# Altium PCB Octo-Electrode.PcbDoc (part 4 of 6)
Units mm, origin at the board's own origin, x right, y up, seen from the top; angles counter-clockwise.
Board outline 202.91 x 135.89 mm, 2 copper layers (Top Layer, Bottom Layer); 289 components, 165 nets, 790 pads, 510 vias.
Unrouted connection lines stored in the file: 83.
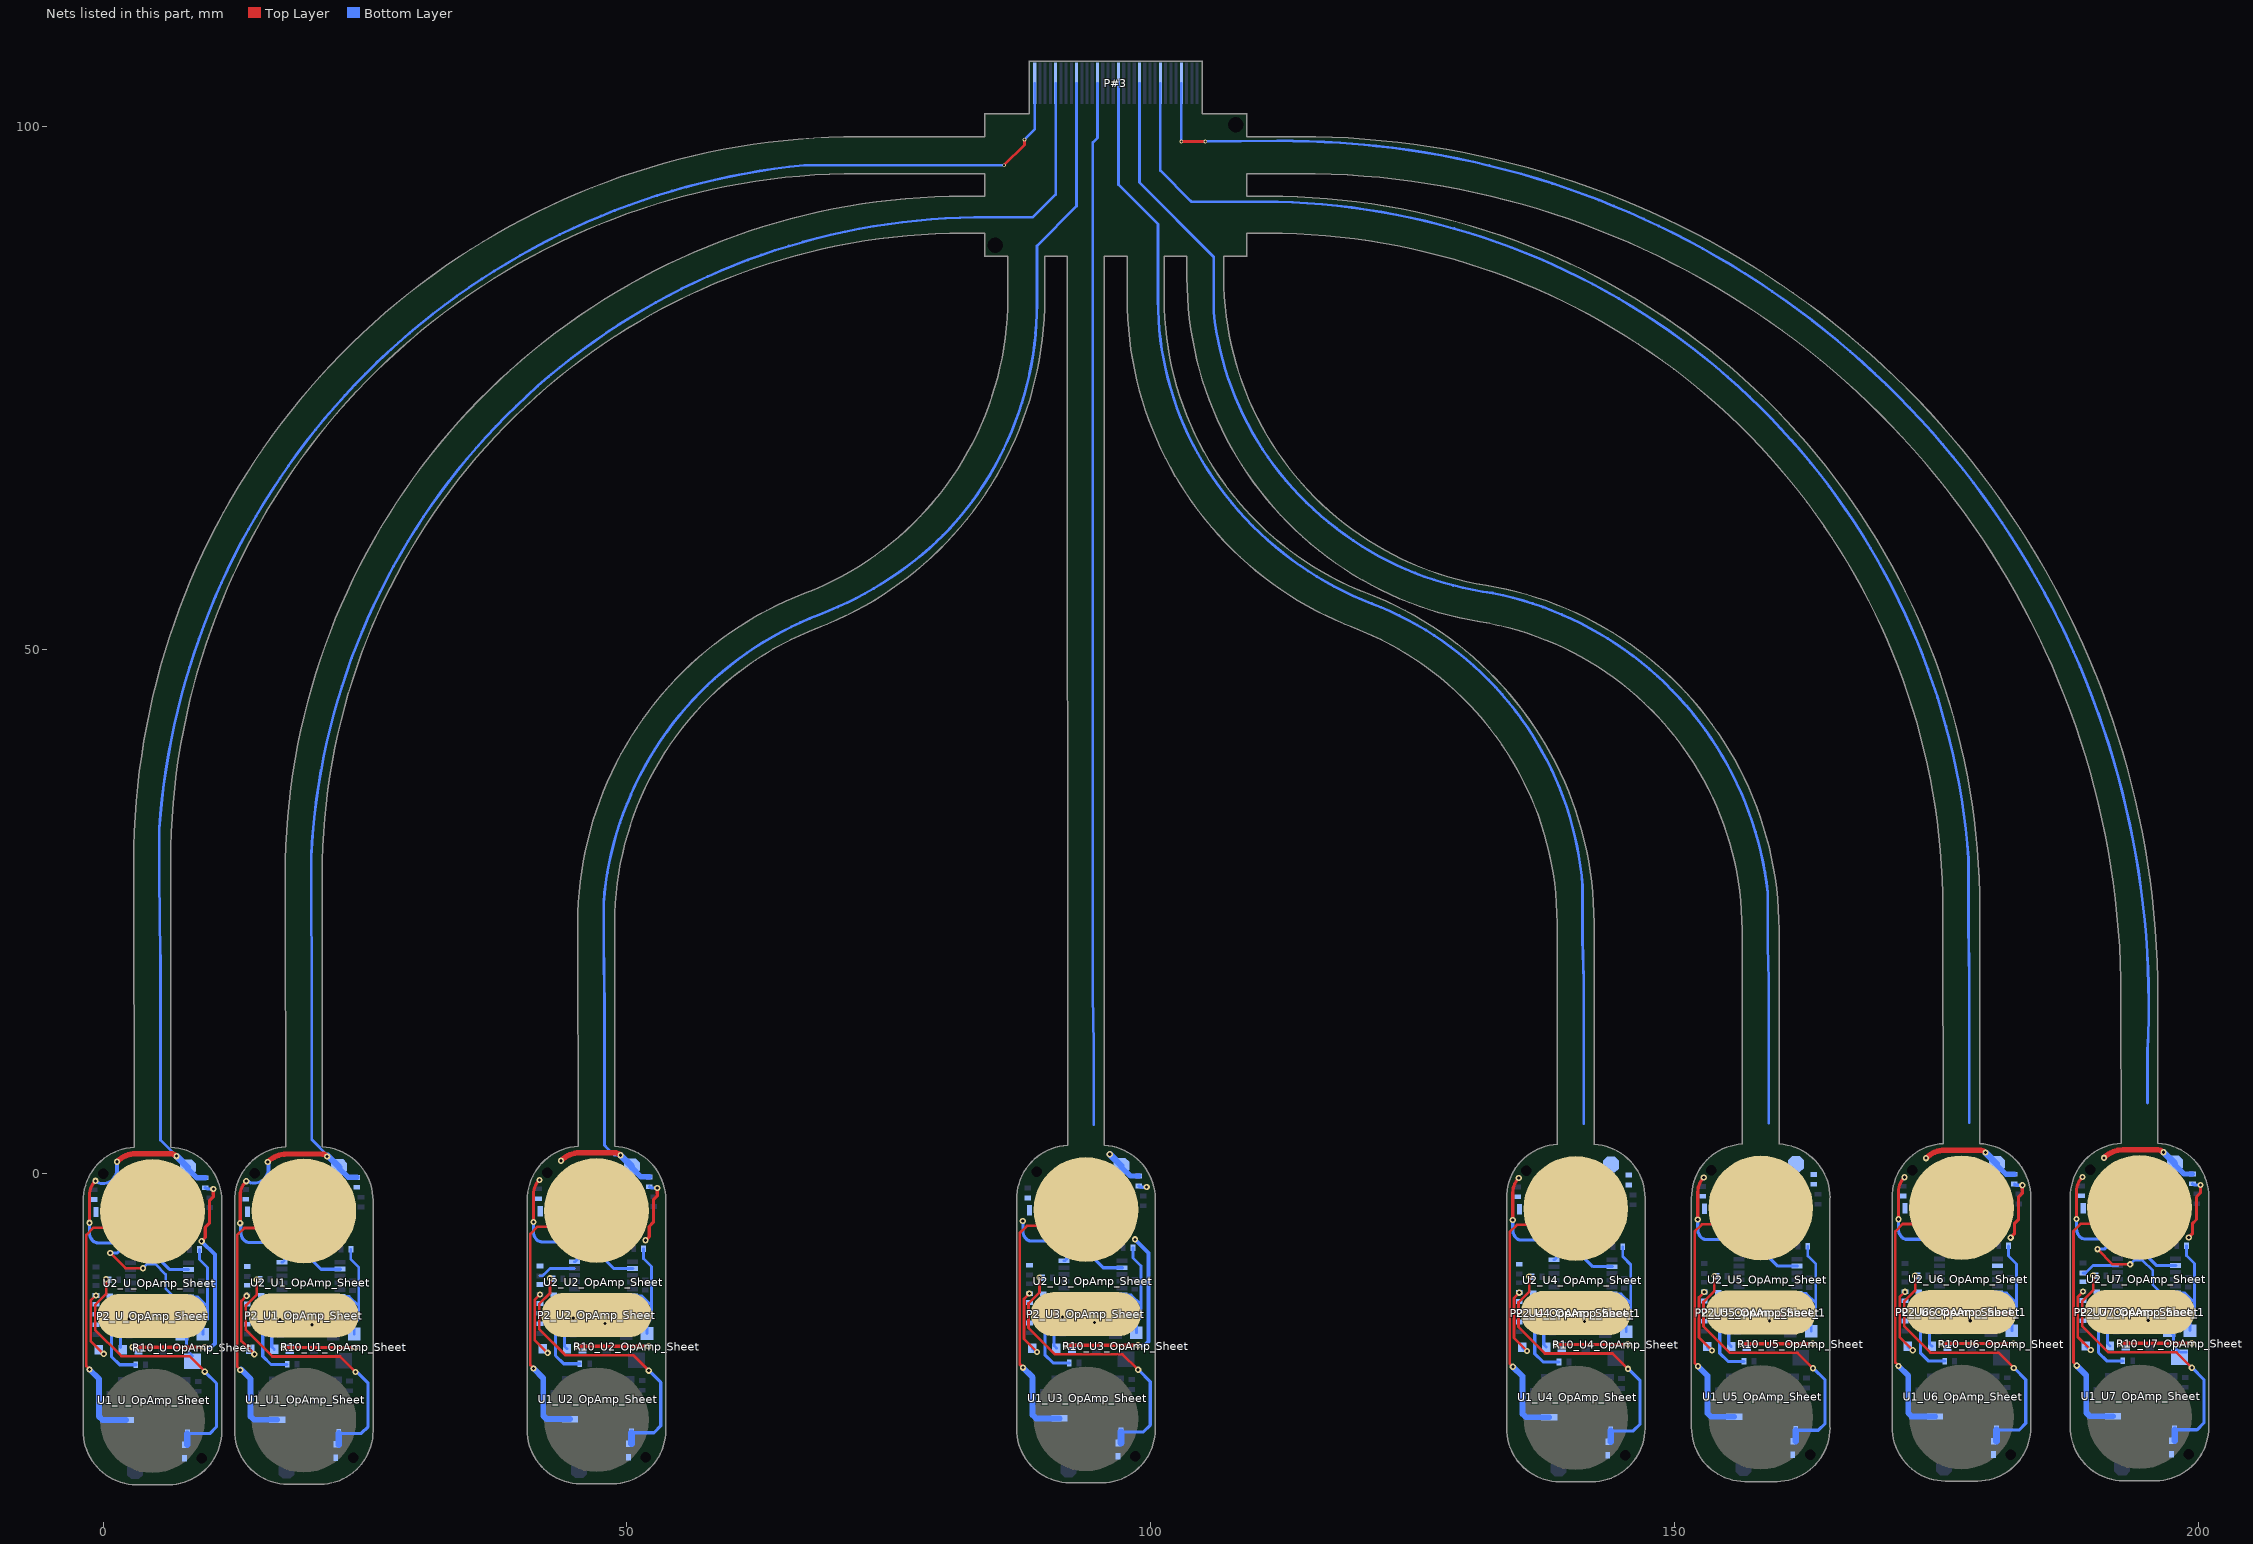
[diagram p3: the nets of this part, all layers, seen from the top]

## Via types
v1: diameter 0.6, hole 0.3, Top Layer to Bottom Layer, tented both sides, 464 vias
v2: diameter 0.35, hole 0.2, Top Layer to Bottom Layer, 46 vias

## Nets (pads, with @x,y where several pads share a name; then routed paths per layer and width w, separated by ;. In a path a pad name is that pad's centre, name@x,y a point inside that pad or via, vN(x,y) a via of type N, cw(c..) or ccw(c..) an arc to the next point about the centre after c; other vN are vias at no path point) (continued)
Measure*_U7_OpAmp_Sheet: R10_U7_OpAmp_Sheet.1 R10_U7_OpAmp_Sheet.2 SB8_U7_OpAmp_Sheet.1 SB8_U7_OpAmp_Sheet_1.1 U2_U7_OpAmp_Sheet.14 | length 17.4
  Top Layer w0.254: v1(190.368,-7.204) 191.817,-8.653 v1(193.495,-8.653)
  Bottom Layer w0.254: v1(193.495,-8.653) 193.881,-8.267 194.669,-8.267 195.654,-9.252 195.654,-10.604 197,-11.95 ; R10_U7_OpAmp_Sheet.1@197.21,-14.973 197.635,-15.398 197.635,-16.243 ; 197.21,-13.15 197.787,-12.573 ; 197.864,-16.675 198.219,-17.03 198.422,-17.03 R10_U7_OpAmp_Sheet.2@198.838,-17.03
  Bottom Layer w0.305: v1(190.368,-7.204) 191.028,-7.204 191.781,-6.451 SB8_U7_OpAmp_Sheet_1.1@191.781,-5.651
  Bottom Layer w0.559: R10_U7_OpAmp_Sheet.1@197.21,-14.973 197.21,-13.15
  other v1: 193.495,-8.653 190.368,-7.204
Measure*_U_OpAmp_Sheet: R10_U_OpAmp_Sheet.1 R10_U_OpAmp_Sheet.2 SB8_U_OpAmp_Sheet.1 U2_U_OpAmp_Sheet.14 | length 15.2
  Top Layer w0.254: v1(0.683,-7.572) 2.132,-9.022 v1(3.81,-9.022)
  Bottom Layer w0.254: v1(3.81,-9.022) 4.196,-8.636 4.984,-8.636 5.969,-9.621 5.969,-10.973 7.315,-12.319 ; 7.95,-16.612 R10_U_OpAmp_Sheet.1@7.95,-15.766 ; 8.179,-17.043 R10_U_OpAmp_Sheet.2@8.534,-17.399
  Bottom Layer w0.305: v1(0.683,-7.572) 1.343,-7.572 2.095,-6.82 SB8_U_OpAmp_Sheet.1@2.095,-6.205
  Bottom Layer w0.559: R10_U_OpAmp_Sheet.1@7.525,-15.342 7.525,-13.518
  other v1: 3.81,-9.022 0.683,-7.572
Measure_U1_OpAmp_Sheet: LED1_U1_OpAmp_Sheet.1 P3_U1_OpAmp_Sheet.1 P#3.5 SB7_U1_OpAmp_Sheet.2 SB8_U1_OpAmp_Sheet.2 | length 170.2
  Top Layer w0.305: v1(13.078,-4.721) 13.078,-2.098 cw(c15.041,-2.098) v1(13.653,-0.711)
  Top Layer w0.508: v1(15.71,1.118) 15.729,1.136 cw(c17.525,-0.66) 17.525,1.88 20.819,1.88 cw(c20.819,1.083) v1(21.383,1.647)
  Bottom Layer w0.254: 14.329,-0.901 14.4,-0.901 ; 18.401,-4.244 18.401,-3.646 ; v1@21.446,1.71 19.915,3.24 19.915,18.365 19.848,26.976 19.848,30.252 cw(c20.102,30.251) 19.848,30.263 cw(c84.036,27.021) 84.562,91.289 88.733,91.289 90.921,93.477 P#3.5@90.921,104.09
  Bottom Layer w0.305: v1@13.141,-4.658 13.141,-5.588 ccw(c14.236,-5.588) 13.462,-6.362 ccw(c13.952,-5.872) 13.952,-6.566 15.519,-6.566 ; v1@13.716,-0.647 ccw(c14.329,-0.034) 14.329,-0.901 ; 14.4,-0.901 ccw(c14.4,0.573) 15.443,-0.47 ; 15.798,-5.143 17.266,-5.143 ccw(c17.266,-3.842) 18.186,-4.762 ccw(c17.668,-4.244) 18.401,-4.244
  Bottom Layer w0.381: 15.443,-0.47 ccw(c14.646,0.328) 15.773,0.328 v1@15.773,1.181
  Bottom Layer w0.508: P3_U1_OpAmp_Sheet.1@22.529,0.521 23.406,-0.355 SB7_U1_OpAmp_Sheet.2@24.206,-0.355
  Bottom Layer w0.635: v1@21.446,1.71 P3_U1_OpAmp_Sheet.1@22.529,0.626
  other v1: 13.078,-4.721 13.653,-0.711 15.71,1.118 21.383,1.647
Measure_U2_OpAmp_Sheet: LED1_U2_OpAmp_Sheet.1 P3_U2_OpAmp_Sheet.1 P#3.9 SB7_U2_OpAmp_Sheet.2 SB8_U2_OpAmp_Sheet.2 | length 152.2
  Top Layer w0.305: v1(41.07,-4.605) 41.07,-1.982 cw(c43.033,-1.982) v1(41.645,-0.594) ; v1(51.779,-6.36) 52.135,-6.004 52.135,-5.039 52.521,-4.653 52.521,-2.494 52.897,-2.118 v1(52.897,-1.361)
  Top Layer w0.508: v1@43.72,1.253 cw(c45.516,-0.543) 45.516,1.997 48.811,1.997 cw(c48.811,1.2) v1(49.375,1.763)
  Bottom Layer w0.254: 43.355,-4.711 cw(c42.895,-5.171) 43.545,-5.171 ; SB8_U2_OpAmp_Sheet.2@43.545,-5.931 43.545,-5.171 ; 43.736,-5.092 ccw(c43.736,-5.362) 43.545,-5.171 ; 46.338,-4.193 46.338,-3.596 ; v1(49.375,1.763) 48.801,1.763 47.949,2.615 47.852,2.712 47.852,15.597 47.772,22.353 47.772,25.82 cw(c79.885,23.284) 68.361,53.365 ccw(c55.805,86.121) 77.522,58.571 ccw(c59.358,81.614) 83.534,64.989 ccw(c57.313,83.022) 89.137,83.022 89.137,88.574 92.921,92.358 P#3.9@92.921,104.09
  Bottom Layer w0.305: v1@41.078,-4.607 41.078,-5.537 ccw(c42.174,-5.537) 41.399,-6.312 ccw(c41.889,-5.821) 41.889,-6.515 43.456,-6.515 ccw(c43.242,-6.3) 43.545,-6.3 SB8_U2_OpAmp_Sheet.2@43.545,-5.931 ; 43.736,-5.092 45.203,-5.092 ccw(c45.203,-3.792) 46.123,-4.711 ccw(c45.605,-4.193) 46.338,-4.193 ; SB7_U2_OpAmp_Sheet.2@52.143,-1.244 ccw(c52.431,-0.957) 52.431,-1.363 v1@52.905,-1.363
  Bottom Layer w0.508: P3_U2_OpAmp_Sheet.1@50.467,0.677 50.467,0.572 51.343,-0.305 52.143,-0.305
  Bottom Layer w0.635: v1@49.383,1.761 P3_U2_OpAmp_Sheet.1@50.467,0.677
  other v1: 43.702,1.235
Measure_U3_OpAmp_Sheet: LED1_U3_OpAmp_Sheet.1 P3_U3_OpAmp_Sheet.1 P#3.13 SB7_U3_OpAmp_Sheet.2 SB8_U3_OpAmp_Sheet.2 | length 112.9
  Bottom Layer w0.254: 90.076,-4.635 cw(c89.616,-5.095) 90.267,-5.095 ; SB8_U3_OpAmp_Sheet.2@90.267,-5.854 90.267,-5.095 ; 90.457,-5.016 ccw(c90.457,-5.286) 90.267,-5.095 ; 93.059,-4.117 93.059,-3.519 ; 94.574,4.675 94.574,12.31 94.474,17.048 94.474,87.758 94.474,98.43 94.921,98.876 P#3.13@94.921,104.09
  Bottom Layer w0.305: v1@87.799,-4.531 87.799,-5.461 ccw(c88.895,-5.461) 88.12,-6.235 ccw(c88.611,-5.745) 88.611,-6.439 90.178,-6.439 ccw(c89.963,-6.224) 90.267,-6.224 SB8_U3_OpAmp_Sheet.2@90.267,-5.854 ; 90.457,-5.016 91.925,-5.016 ccw(c91.925,-3.715) 92.845,-4.635 ccw(c92.326,-4.117) 93.059,-4.117
  Bottom Layer w0.508: P3_U3_OpAmp_Sheet.1@97.188,0.753 97.188,0.648 98.064,-0.228 SB7_U3_OpAmp_Sheet.2@98.865,-0.228
  Bottom Layer w0.635: v1@96.104,1.837 P3_U3_OpAmp_Sheet.1@97.188,0.753
  other v1: 87.785,-4.515 87.785,-4.515 96.09,1.853 96.09,1.853
Measure_U4_OpAmp_Sheet: LED1_U4_OpAmp_Sheet.1 P3_U4_OpAmp_Sheet.1 P#3.17 SB7_U4_OpAmp_Sheet.2 SB8_U4_OpAmp_Sheet.2 | length 131.9
  Top Layer w0.305: v1(134.555,-4.43) 134.555,-1.807 cw(c136.517,-1.807) v1(135.129,-0.419)
  Bottom Layer w0.254: P#3.17@96.921,104.09 96.921,94.414 100.689,90.646 100.689,83.388 ccw(c130.727,83.388) 105.971,66.375 ccw(c132.898,84.879) 112.666,59.225 ccw(c132.743,84.682) 121.086,54.429 cw(c109.815,25.008) 141.223,27.495 141.223,22.379 141.329,18.406 141.329,4.776 ; 136.831,-4.534 cw(c136.371,-4.994) 137.022,-4.994 ; SB8_U4_OpAmp_Sheet.2@137.022,-5.753 137.022,-4.994 ; 137.212,-4.915 ccw(c137.212,-5.184) 137.022,-4.994 ; 139.814,-4.015 139.814,-3.418
  Bottom Layer w0.305: v1(134.555,-4.43) 134.555,-5.359 ccw(c135.65,-5.359) 134.875,-6.134 ccw(c135.366,-5.643) 135.366,-6.337 136.933,-6.337 ccw(c136.718,-6.122) 137.022,-6.122 SB8_U4_OpAmp_Sheet.2@137.022,-5.753 ; 137.212,-4.915 138.68,-4.915 ccw(c138.68,-3.614) 139.6,-4.534 ccw(c139.081,-4.015) 139.814,-4.015
  other v1: 134.555,-4.43 135.129,-0.419
Measure_U5_OpAmp_Sheet: LED1_U5_OpAmp_Sheet.1 P3_U5_OpAmp_Sheet.1 P#3.21 SB7_U5_OpAmp_Sheet.2 SB8_U5_OpAmp_Sheet.2 | length 142.9
  Top Layer w0.305: v1(152.216,-4.379) 152.216,-1.756 cw(c154.178,-1.756) v1(152.791,-0.368)
  Bottom Layer w0.254: P#3.21@98.921,104.09 98.921,94.611 106.002,87.53 106.002,82.259 ccw(c135.606,85.433) 112.913,66.159 ccw(c136.682,86.347) 132.639,55.425 cw(c132.606,55.173) 132.654,55.423 cw(c126.262,23.205) 158.907,26.832 cw(c158.654,26.805) 158.908,26.805 158.908,21.718 158.99,18.457 158.99,4.827 ; 154.492,-4.483 cw(c154.032,-4.943) 154.683,-4.943 ; SB8_U5_OpAmp_Sheet.2@154.683,-5.702 154.683,-4.943 ; 154.873,-4.864 ccw(c154.873,-5.133) 154.683,-4.943 ; 157.476,-3.965 157.476,-3.367
  Bottom Layer w0.305: v1(152.216,-4.379) 152.216,-5.308 ccw(c153.311,-5.308) 152.537,-6.083 ccw(c153.027,-5.592) 153.027,-6.286 154.594,-6.286 ccw(c154.379,-6.072) 154.683,-6.072 SB8_U5_OpAmp_Sheet.2@154.683,-5.702 ; 154.873,-4.864 156.341,-4.864 ccw(c156.341,-3.563) 157.261,-4.483 ccw(c156.743,-3.965) 157.476,-3.965
  other v1: 152.216,-4.379 152.791,-0.368
Measure_U6_OpAmp_Sheet: LED1_U6_OpAmp_Sheet.1 P3_U6_OpAmp_Sheet.1 P#3.25 SB7_U6_OpAmp_Sheet.2 SB8_U6_OpAmp_Sheet.2 | length 169.2
  Top Layer w0.305: v1(171.374,-4.353) 171.374,-1.73 cw(c173.337,-1.73) v1(171.949,-0.343)
  Top Layer w0.508: v1(174.007,1.486) 174.025,1.504 cw(c175.821,-0.292) 175.821,2.248 179.116,2.248 cw(c179.116,1.451) v1(179.679,2.015)
  Bottom Layer w0.254: P#3.25@100.921,104.09 100.921,95.746 103.804,92.862 103.879,92.787 110.676,92.787 cw(c110.495,25.027) 178.067,30.08 cw(c177.814,30.062) 178.068,30.062 178.068,23.776 178.149,18.482 178.149,4.853 ; 173.651,-4.457 cw(c173.191,-4.917) 173.842,-4.917 ; SB8_U6_OpAmp_Sheet.2@173.842,-5.677 173.842,-4.917 ; 174.032,-4.838 ccw(c174.032,-5.108) 173.842,-4.917 ; 176.634,-3.939 176.634,-3.342
  Bottom Layer w0.305: v1(171.374,-4.353) 171.374,-5.283 ccw(c172.47,-5.283) 171.695,-6.058 ccw(c172.186,-5.567) 172.186,-6.261 173.753,-6.261 ccw(c173.538,-6.046) 173.842,-6.046 SB8_U6_OpAmp_Sheet.2@173.842,-5.677 ; 174.032,-4.838 175.5,-4.838 ccw(c175.5,-3.538) 176.42,-4.457 ccw(c175.901,-3.939) 176.634,-3.939
  Bottom Layer w0.508: P3_U6_OpAmp_Sheet.1@180.763,0.931 180.763,0.826 181.639,-0.051 SB7_U6_OpAmp_Sheet.2@182.44,-0.051
  Bottom Layer w0.635: v1(179.679,2.015) P3_U6_OpAmp_Sheet.1@180.763,0.931
  other v1: 171.374,-4.353 171.949,-0.343 174.007,1.486 179.679,2.015
Measure_U7_OpAmp_Sheet: LED1_U7_OpAmp_Sheet.1 LED1_U7_OpAmp_Sheet_1.1 P3_U7_OpAmp_Sheet.1 P#3.29 SB7_U7_OpAmp_Sheet.2 SB7_U7_OpAmp_Sheet_1.2 SB8_U7_OpAmp_Sheet.2 SB8_U7_OpAmp_Sheet_1.2 | length 177.8
  Top Layer w0.254: v2(102.919,98.528) v2(105.215,98.528)
  Top Layer w0.305: v1(188.374,-4.328) 188.374,-1.705 cw(c190.336,-1.705) v1(188.948,-0.317)
  Top Layer w0.508: v1(191.006,1.512) 191.024,1.53 cw(c192.82,-0.266) 192.82,2.274 196.115,2.274 cw(c196.115,1.477) v1(196.678,2.04)
  Bottom Layer w0.254: v2@102.921,98.53 P#3.29@102.921,104.09 ; v2(105.215,98.528) 112.082,98.596 cw(c112.085,8.438) 118.097,98.396 cw(c112.085,8.438) 121.524,98.101 cw(c112.901,16.185) 195.148,11.715 ; 190.65,-4.432 cw(c190.19,-4.892) 190.841,-4.892 ; SB8_U7_OpAmp_Sheet_1.2@190.841,-5.651 190.841,-4.892 ; 191.031,-4.813 ccw(c191.031,-5.082) 190.841,-4.892 ; 193.633,-3.914 193.633,-3.316 ; 195.148,6.751 195.148,11.702
  Bottom Layer w0.305: v1(188.374,-4.328) 188.374,-5.258 ccw(c189.469,-5.258) 188.694,-6.032 ccw(c189.185,-5.542) 189.185,-6.235 190.752,-6.235 ccw(c190.537,-6.021) 190.841,-6.021 SB8_U7_OpAmp_Sheet_1.2@190.841,-5.651 ; 191.031,-4.813 192.499,-4.813 ccw(c192.499,-3.512) 193.419,-4.432 ccw(c192.9,-3.914) 193.633,-3.914
  Bottom Layer w0.508: P3_U7_OpAmp_Sheet.1@197.762,0.956 197.762,0.851 198.639,-0.025 SB7_U7_OpAmp_Sheet_1.2@199.439,-0.025
  Bottom Layer w0.635: v1(196.678,2.04) P3_U7_OpAmp_Sheet.1@197.762,0.956
  other v1: 188.374,-4.328 188.948,-0.317 191.006,1.512 196.678,2.04
Measure_U_OpAmp_Sheet: LED1_U_OpAmp_Sheet.1 P3_U_OpAmp_Sheet.1 P#3.1 SB7_U_OpAmp_Sheet.2 SB8_U_OpAmp_Sheet.2 | length 181.6
  Top Layer w0.254: v2(86.01,96.267) 87.943,98.2 v2(87.943,98.706)
  Top Layer w0.305: v1(-1.311,-4.697) -1.311,-2.074 cw(c0.651,-2.074) v1(-0.737,-0.686)
  Top Layer w0.508: v1@1.339,1.161 cw(c3.135,-0.635) 3.135,1.905 6.43,1.905 cw(c6.43,1.108) v1(6.993,1.672)
  Bottom Layer w0.254: -0.123,-0.94 -0.052,-0.94 ; SB8_U_OpAmp_Sheet.2@1.171,-6.028 1.171,-5.269 ; 3.93,-4.282 3.948,-4.263 3.948,-3.685 ; 5.362,32.88 5.362,28.195 5.463,20.855 ; 5.362,32.896 cw(c73.639,28.156) 66.915,96.266 ; 5.471,20.855 5.471,3.194 v1(6.993,1.672) ; 66.939,96.267 v2(86.01,96.267) ; v2(87.943,98.706) 88.923,99.686 P#3.1@88.923,104.088
  Bottom Layer w0.305: v1(-1.311,-4.697) -1.311,-5.626 ccw(c-0.216,-5.626) -0.991,-6.401 ccw(c-0.5,-5.91) -0.5,-6.604 1.067,-6.604 ; v1(-0.737,-0.686) ccw(c-0.123,-0.073) -0.123,-0.94 ; -0.052,-0.94 ccw(c-0.052,0.534) 0.991,-0.508 ; 1.346,-5.182 2.814,-5.182 ccw(c2.814,-3.881) 3.733,-4.802 3.93,-4.448 3.93,-4.282
  Bottom Layer w0.381: 0.991,-0.508 ccw(c0.193,0.289) 1.321,0.289 v1(1.321,1.143)
  Bottom Layer w0.508: P3_U_OpAmp_Sheet.1@8.077,0.483 8.954,-0.394 SB7_U_OpAmp_Sheet.2@9.754,-0.394
  Bottom Layer w0.635: v1(6.993,1.672) P3_U_OpAmp_Sheet.1@8.077,0.588
MID_U1_OpAmp_Sheet: P2_U1_OpAmp_Sheet.2 U1_U1_OpAmp_Sheet.1 | length 27.8
  Top Layer w0.254: v1@13.094,-18.719 13.094,-18.702 12.789,-18.397 12.789,-5.867 13.478,-5.178 17.531,-5.178 P2_U1_OpAmp_Sheet.2@19.101,-3.608
  Bottom Layer w0.559: v1@13.152,-18.67 14.066,-19.584 14.066,-23.169 14.394,-23.496 U1_U1_OpAmp_Sheet.1@16.623,-23.496
  other v1: 13.089,-18.733 13.089,-18.733
MID_U2_OpAmp_Sheet: P2_U2_OpAmp_Sheet.2 U1_U2_OpAmp_Sheet.1 | length 27.8
  Top Layer w0.254: v1(41.086,-18.603) 41.086,-18.586 40.781,-18.281 40.781,-5.75 41.47,-5.062 45.523,-5.062 P2_U2_OpAmp_Sheet.2@47.093,-3.491
  Bottom Layer w0.559: v1@41.094,-18.605 42.009,-19.52 42.009,-23.104 42.336,-23.431 U1_U2_OpAmp_Sheet.1@44.566,-23.431
  other v1: 41.086,-18.603
MID_U3_OpAmp_Sheet: P2_U3_OpAmp_Sheet.2 U1_U3_OpAmp_Sheet.1 | length 27.8
  Top Layer w0.254: v1(87.801,-18.513) 87.801,-18.496 87.496,-18.191 87.496,-5.661 88.185,-4.972 92.238,-4.972 P2_U3_OpAmp_Sheet.2@93.808,-3.402
  Bottom Layer w0.559: v1@87.816,-18.529 88.73,-19.443 88.73,-23.028 89.057,-23.355 U1_U3_OpAmp_Sheet.1@91.287,-23.355
  other v1: 87.801,-18.513
MID_U4_OpAmp_Sheet: P2_U4_OpAmp_Sheet.2 P2_U4_OpAmp_Sheet_1.2 U1_U4_OpAmp_Sheet.1 | length 27.8
  Top Layer w0.254: v1(134.571,-18.427) 134.571,-18.41 134.266,-18.106 134.266,-5.575 134.954,-4.886 139.007,-4.886 P2_U4_OpAmp_Sheet_1.2@140.577,-3.316
  Bottom Layer w0.559: v1(134.571,-18.427) 135.485,-19.342 135.485,-22.926 135.812,-23.253 U1_U4_OpAmp_Sheet.1@138.042,-23.253
  other v1: 134.571,-18.427
MID_U5_OpAmp_Sheet: P2_U5_OpAmp_Sheet.2 P2_U5_OpAmp_Sheet_1.2 U1_U5_OpAmp_Sheet.1 | length 27.8
  Top Layer w0.254: v1(152.232,-18.377) 152.232,-18.36 151.927,-18.055 151.927,-5.524 152.616,-4.836 156.668,-4.836 P2_U5_OpAmp_Sheet_1.2@158.239,-3.265
  Bottom Layer w0.559: v1(152.232,-18.377) 153.146,-19.291 153.146,-22.875 153.473,-23.203 U1_U5_OpAmp_Sheet.1@155.703,-23.203
  other v1: 152.232,-18.377
MID_U6_OpAmp_Sheet: P2_U6_OpAmp_Sheet.2 P2_U6_OpAmp_Sheet_1.2 U1_U6_OpAmp_Sheet.1 | length 27.8
  Top Layer w0.254: v1(171.391,-18.351) 171.391,-18.334 171.086,-18.029 171.086,-5.499 171.774,-4.81 175.827,-4.81 P2_U6_OpAmp_Sheet_1.2@177.397,-3.24
  Bottom Layer w0.559: v1(171.391,-18.351) 172.305,-19.266 172.305,-22.85 172.632,-23.177 U1_U6_OpAmp_Sheet.1@174.862,-23.177
  other v1: 171.391,-18.351
MID_U7_OpAmp_Sheet: P2_U7_OpAmp_Sheet.2 P2_U7_OpAmp_Sheet_1.2 U1_U7_OpAmp_Sheet.1 | length 27.8
  Top Layer w0.254: v1(188.39,-18.326) 188.39,-18.309 188.085,-18.004 188.085,-5.473 188.773,-4.785 192.826,-4.785 P2_U7_OpAmp_Sheet_1.2@194.396,-3.215
  Bottom Layer w0.559: v1(188.39,-18.326) 189.304,-19.24 189.304,-22.825 189.631,-23.152 U1_U7_OpAmp_Sheet.1@191.861,-23.152
  other v1: 188.39,-18.326
MID_U_OpAmp_Sheet: P2_U_OpAmp_Sheet.2 U1_U_OpAmp_Sheet.1 | length 25.6
  Top Layer w0.254: v1@-1.296,-18.677 -1.6,-18.372 -1.6,-5.842 -0.912,-5.153 P2_U_OpAmp_Sheet.2@3.141,-5.153
  Bottom Layer w0.559: v1@-1.296,-18.694 -0.381,-19.608 -0.381,-23.193 -0.054,-23.52 U1_U_OpAmp_Sheet.1@2.176,-23.52
  other v1: -1.295,-18.694 -1.295,-18.694
NetC1_U1_OpAmp_Sheet_2: C1_U1_OpAmp_Sheet.2 C2_U1_OpAmp_Sheet.2 SB1_U1_OpAmp_Sheet.1 SB2_U1_OpAmp_Sheet.1 | length 27.3
  Top Layer w0.254: v1@14.669,-10.109 14.669,-11.531 13.622,-12.578 13.622,-14.929 16.142,-17.449 22.618,-17.449 v1@24.089,-18.92
  Bottom Layer w0.305: C1_U1_OpAmp_Sheet.2@22.499,-24.791 24.642,-24.791 25.293,-24.141 25.293,-19.992 24.172,-18.871 v1@24.147,-18.871
  Bottom Layer w0.635: 22.499,-25.845 C1_U1_OpAmp_Sheet.2@22.499,-24.791
  other v1: 24.084,-18.934 24.084,-18.934 14.664,-10.122 14.664,-10.122
NetC1_U2_OpAmp_Sheet_2: C1_U2_OpAmp_Sheet.2 C2_U2_OpAmp_Sheet.2 SB1_U2_OpAmp_Sheet.1 SB2_U2_OpAmp_Sheet.1 | length 27.3
  Top Layer w0.254: v1(42.661,-9.992) 42.661,-11.414 41.614,-12.461 41.614,-14.813 44.134,-17.333 50.61,-17.333 v1(52.081,-18.804)
  Bottom Layer w0.305: C1_U2_OpAmp_Sheet.2@50.441,-24.727 52.585,-24.727 53.235,-24.076 53.235,-19.927 52.115,-18.806 v1@52.089,-18.806
  Bottom Layer w0.635: 50.441,-25.781 C1_U2_OpAmp_Sheet.2@50.441,-24.727
  other v1: 52.081,-18.804 42.661,-9.992
NetC1_U3_OpAmp_Sheet_2: C1_U3_OpAmp_Sheet.2 C2_U3_OpAmp_Sheet.2 SB1_U3_OpAmp_Sheet.1 SB2_U3_OpAmp_Sheet.1 | length 27.3
  Top Layer w0.254: v1(89.376,-9.902) 89.376,-11.325 88.329,-12.371 88.329,-14.723 90.849,-17.243 97.325,-17.243 v1(98.796,-18.714)
  Bottom Layer w0.305: C1_U3_OpAmp_Sheet.2@97.163,-24.65 99.306,-24.65 99.957,-24 99.957,-19.851 98.836,-18.73 v1@98.81,-18.73
  Bottom Layer w0.635: 97.163,-25.705 C1_U3_OpAmp_Sheet.2@97.163,-24.65
  other v1: 98.796,-18.714 89.376,-9.902
NetC1_U4_OpAmp_Sheet_2: C1_U4_OpAmp_Sheet.2 C2_U4_OpAmp_Sheet.2 SB1_U4_OpAmp_Sheet.1 SB2_U4_OpAmp_Sheet.1 | length 27.3
  Top Layer w0.254: v1(136.145,-9.817) 136.145,-11.239 135.099,-12.286 135.099,-14.638 137.619,-17.157 144.094,-17.157 v1(145.566,-18.628)
  Bottom Layer w0.305: C1_U4_OpAmp_Sheet.2@143.918,-24.549 146.061,-24.549 146.712,-23.898 146.712,-19.749 145.591,-18.628 v1(145.566,-18.628)
  Bottom Layer w0.635: 143.918,-25.603 C1_U4_OpAmp_Sheet.2@143.918,-24.549
  other v1: 145.566,-18.628 136.145,-9.817
NetC1_U5_OpAmp_Sheet_2: C1_U5_OpAmp_Sheet.2 C2_U5_OpAmp_Sheet.2 SB1_U5_OpAmp_Sheet.1 SB2_U5_OpAmp_Sheet.1 | length 27.3
  Top Layer w0.254: v1(153.807,-9.766) 153.807,-11.188 152.76,-12.235 152.76,-14.587 155.28,-17.107 161.756,-17.107 v1(163.227,-18.578)
  Bottom Layer w0.305: C1_U5_OpAmp_Sheet.2@161.579,-24.498 163.722,-24.498 164.373,-23.847 164.373,-19.698 163.252,-18.578 v1(163.227,-18.578)
  Bottom Layer w0.635: 161.579,-25.552 C1_U5_OpAmp_Sheet.2@161.579,-24.498
  other v1: 163.227,-18.578 153.807,-9.766
NetC1_U6_OpAmp_Sheet_2: C1_U6_OpAmp_Sheet.2 C2_U6_OpAmp_Sheet.2 SB1_U6_OpAmp_Sheet.1 SB2_U6_OpAmp_Sheet.1 | length 27.3
  Top Layer w0.254: v1(172.965,-9.741) 172.965,-11.163 171.919,-12.21 171.919,-14.561 174.439,-17.081 180.914,-17.081 v1(182.385,-18.552)
  Bottom Layer w0.305: C1_U6_OpAmp_Sheet.2@180.738,-24.473 182.881,-24.473 183.532,-23.822 183.532,-19.673 182.411,-18.552 v1(182.385,-18.552)
  Bottom Layer w0.635: 180.738,-25.527 C1_U6_OpAmp_Sheet.2@180.738,-24.473
  other v1: 182.385,-18.552 172.965,-9.741
NetC1_U7_OpAmp_Sheet_2: C1_U7_OpAmp_Sheet.2 C1_U7_OpAmp_Sheet_1.2 C2_U7_OpAmp_Sheet.2 C2_U7_OpAmp_Sheet_1.2 SB1_U7_OpAmp_Sheet.1 SB1_U7_OpAmp_Sheet_1.1 SB2_U7_OpAmp_Sheet.1 SB2_U7_OpAmp_Sheet_1.1 | length 27.3
  Top Layer w0.254: v1(189.964,-9.715) 189.964,-11.138 188.918,-12.184 188.918,-14.536 191.438,-17.056 197.913,-17.056 v1(199.384,-18.527)
  Bottom Layer w0.305: C1_U7_OpAmp_Sheet_1.2@197.737,-24.447 199.88,-24.447 200.531,-23.797 200.531,-19.647 199.41,-18.527 v1(199.384,-18.527)
  Bottom Layer w0.635: 197.737,-25.501 C1_U7_OpAmp_Sheet_1.2@197.737,-24.447
  other v1: 199.384,-18.527 189.964,-9.715
NetC1_U_OpAmp_Sheet_2: C1_U_OpAmp_Sheet.2 C2_U_OpAmp_Sheet.2 SB1_U_OpAmp_Sheet.1 SB2_U_OpAmp_Sheet.1 | length 27.2
  Top Layer w0.254: v1(0.279,-10.084) 0.279,-11.506 -0.767,-12.553 -0.767,-14.905 1.753,-17.424 8.228,-17.424 v1(9.699,-18.895)
  Bottom Layer w0.305: C1_U_OpAmp_Sheet.2@8.026,-24.816 10.169,-24.816 10.82,-24.165 10.82,-20.016 v1(9.699,-18.895)
  Bottom Layer w0.635: 8.026,-25.87 C1_U_OpAmp_Sheet.2@8.026,-24.816
  other v1: 9.699,-18.895 0.279,-10.084
NetC3_U1_OpAmp_Sheet_2: C3_U1_OpAmp_Sheet.2 R5_U1_OpAmp_Sheet.2
NetC3_U2_OpAmp_Sheet_2: C3_U2_OpAmp_Sheet.2 R5_U2_OpAmp_Sheet.2
NetC3_U3_OpAmp_Sheet_2: C3_U3_OpAmp_Sheet.2 R5_U3_OpAmp_Sheet.2
NetC3_U4_OpAmp_Sheet_2: C3_U4_OpAmp_Sheet.2 R5_U4_OpAmp_Sheet.2
NetC3_U5_OpAmp_Sheet_2: C3_U5_OpAmp_Sheet.2 R5_U5_OpAmp_Sheet.2
NetC3_U6_OpAmp_Sheet_2: C3_U6_OpAmp_Sheet.2 R5_U6_OpAmp_Sheet.2
NetC3_U7_OpAmp_Sheet_2: C3_U7_OpAmp_Sheet.2 R5_U7_OpAmp_Sheet.2
NetC3_U_OpAmp_Sheet_2: C3_U_OpAmp_Sheet.2 R5_U_OpAmp_Sheet.2
NetC6_U1_OpAmp_Sheet_2: C6_U1_OpAmp_Sheet.2 R8_U1_OpAmp_Sheet.1 R9_U1_OpAmp_Sheet.1 U2_U1_OpAmp_Sheet.9 | length 9
  Bottom Layer w0.254: R9_U1_OpAmp_Sheet.1@18.333,-7.24 18.892,-7.24 R8_U1_OpAmp_Sheet.1@19.069,-7.418 ; 18.993,-6.529 21.753,-6.529 21.902,-6.678 21.902,-7.215 C6_U1_OpAmp_Sheet.2@21.8,-7.113 ; R8_U1_OpAmp_Sheet.1@19.158,-7.481 19.158,-7.24 R8_U1_OpAmp_Sheet.1@19.247,-7.329
  Bottom Layer w0.305: R8_U1_OpAmp_Sheet.1@19.158,-7.481 20.793,-9.115 U2_U1_OpAmp_Sheet.9@22.631,-9.115
NetC6_U2_OpAmp_Sheet_2: C6_U2_OpAmp_Sheet.2 R8_U2_OpAmp_Sheet.1 R9_U2_OpAmp_Sheet.1 U2_U2_OpAmp_Sheet.9 | length 9
  Bottom Layer w0.254: R9_U2_OpAmp_Sheet.1@46.275,-7.175 46.834,-7.175 R8_U2_OpAmp_Sheet.1@47.012,-7.353 ; 46.936,-6.464 49.695,-6.464 49.844,-6.613 49.844,-7.15 C6_U2_OpAmp_Sheet.2@49.742,-7.048 ; R8_U2_OpAmp_Sheet.1@47.101,-7.416 47.101,-7.175 R8_U2_OpAmp_Sheet.1@47.19,-7.264
  Bottom Layer w0.305: R8_U2_OpAmp_Sheet.1@47.101,-7.416 48.735,-9.05 U2_U2_OpAmp_Sheet.9@50.574,-9.05
NetC6_U3_OpAmp_Sheet_2: C6_U3_OpAmp_Sheet.2 R8_U3_OpAmp_Sheet.1 R9_U3_OpAmp_Sheet.1 U2_U3_OpAmp_Sheet.9 | length 9
  Bottom Layer w0.254: R9_U3_OpAmp_Sheet.1@92.997,-7.099 93.555,-7.099 R8_U3_OpAmp_Sheet.1@93.733,-7.277 ; 93.657,-6.388 96.417,-6.388 96.565,-6.537 C6_U3_OpAmp_Sheet.2@96.565,-7.074 C6_U3_OpAmp_Sheet.2@96.464,-6.972 ; R8_U3_OpAmp_Sheet.1@93.822,-7.34 93.822,-7.099 R8_U3_OpAmp_Sheet.1@93.911,-7.188
  Bottom Layer w0.305: R8_U3_OpAmp_Sheet.1@93.822,-7.34 95.456,-8.974 U2_U3_OpAmp_Sheet.9@97.295,-8.974
NetC6_U4_OpAmp_Sheet_2: C6_U4_OpAmp_Sheet.2 R8_U4_OpAmp_Sheet.1 R9_U4_OpAmp_Sheet.1 U2_U4_OpAmp_Sheet.9 | length 9
  Bottom Layer w0.254: R9_U4_OpAmp_Sheet.1@139.752,-6.997 140.31,-6.997 R8_U4_OpAmp_Sheet.1@140.488,-7.175 ; 140.412,-6.286 143.172,-6.286 143.32,-6.435 C6_U4_OpAmp_Sheet.2@143.32,-6.972 C6_U4_OpAmp_Sheet.2@143.219,-6.87 ; R8_U4_OpAmp_Sheet.1@140.577,-7.238 140.577,-6.997 R8_U4_OpAmp_Sheet.1@140.666,-7.086
  Bottom Layer w0.305: R8_U4_OpAmp_Sheet.1@140.577,-7.238 142.211,-8.872 U2_U4_OpAmp_Sheet.9@144.05,-8.872
NetC6_U5_OpAmp_Sheet_2: C6_U5_OpAmp_Sheet.2 R8_U5_OpAmp_Sheet.1 R9_U5_OpAmp_Sheet.1 U2_U5_OpAmp_Sheet.9 | length 9
  Bottom Layer w0.254: R9_U5_OpAmp_Sheet.1@157.413,-6.947 157.972,-6.947 R8_U5_OpAmp_Sheet.1@158.149,-7.124 ; 158.073,-6.235 160.833,-6.235 160.981,-6.384 160.981,-6.921 C6_U5_OpAmp_Sheet.2@160.88,-6.82 ; R8_U5_OpAmp_Sheet.1@158.238,-7.187 158.238,-6.947 R8_U5_OpAmp_Sheet.1@158.327,-7.036
  Bottom Layer w0.305: R8_U5_OpAmp_Sheet.1@158.238,-7.187 159.873,-8.822 U2_U5_OpAmp_Sheet.9@161.711,-8.822
NetC6_U6_OpAmp_Sheet_2: C6_U6_OpAmp_Sheet.2 R8_U6_OpAmp_Sheet.1 R9_U6_OpAmp_Sheet.1 U2_U6_OpAmp_Sheet.9
NetC6_U7_OpAmp_Sheet_2: C6_U7_OpAmp_Sheet.2 C6_U7_OpAmp_Sheet_1.2 R8_U7_OpAmp_Sheet.1 R8_U7_OpAmp_Sheet_1.1 R9_U7_OpAmp_Sheet.1 R9_U7_OpAmp_Sheet_1.1 U2_U7_OpAmp_Sheet.9 | length 9
  Bottom Layer w0.254: R9_U7_OpAmp_Sheet_1.1@193.571,-6.896 194.129,-6.896 R8_U7_OpAmp_Sheet_1.1@194.307,-7.074 ; 194.231,-6.185 196.991,-6.185 197.139,-6.333 C6_U7_OpAmp_Sheet_1.2@197.139,-6.87 C6_U7_OpAmp_Sheet_1.2@197.038,-6.769 ; R8_U7_OpAmp_Sheet_1.1@194.396,-7.137 194.396,-6.896 R8_U7_OpAmp_Sheet_1.1@194.485,-6.985
  Bottom Layer w0.305: R8_U7_OpAmp_Sheet_1.1@194.396,-7.137 196.03,-8.771 U2_U7_OpAmp_Sheet.9@197.869,-8.771
NetC6_U_OpAmp_Sheet_2: C6_U_OpAmp_Sheet.2 R8_U_OpAmp_Sheet.1 R9_U_OpAmp_Sheet.1 U2_U_OpAmp_Sheet.9 | length 8.2
  Bottom Layer w0.254: R9_U_OpAmp_Sheet.1@3.86,-7.264 4.419,-7.264 ; 4.546,-6.553 7.306,-6.553 7.454,-6.702 C6_U_OpAmp_Sheet.2@7.454,-7.239
  Bottom Layer w0.305: R8_U_OpAmp_Sheet.1@4.686,-7.505 6.32,-9.139 U2_U_OpAmp_Sheet.9@8.159,-9.139
NetD1_U1_OpAmp_Sheet_2: D1_U1_OpAmp_Sheet.2 R3_U1_OpAmp_Sheet.2 R4_U1_OpAmp_Sheet.2 | length 7
  Top Layer w0.254: v1@13.703,-11.645 13.196,-12.153 13.196,-15.976 v1@14.44,-17.221
  Bottom Layer w0.254: D1_U1_OpAmp_Sheet.2@14.034,-16.79 14.034,-16.84 14.307,-17.113 14.44,-17.113 v1@14.498,-17.171
  other v1: 14.435,-17.234 14.435,-17.234 13.698,-11.659 13.698,-11.659
NetD1_U2_OpAmp_Sheet_2: D1_U2_OpAmp_Sheet.2 R3_U2_OpAmp_Sheet.2 R4_U2_OpAmp_Sheet.2 | length 9.9
  Top Layer w0.254: v1(41.695,-11.529) 41.188,-12.036 41.188,-15.859 v1(42.432,-17.104)
  Bottom Layer w0.254: 41.703,-9.753 41.945,-9.753 42.085,-9.614 42.648,-9.05 44.999,-9.05
  other v1: 42.432,-17.104 41.695,-11.529
NetD1_U3_OpAmp_Sheet_2: D1_U3_OpAmp_Sheet.2 R3_U3_OpAmp_Sheet.2 R4_U3_OpAmp_Sheet.2 | length 7
  Top Layer w0.254: v1(88.41,-11.439) 87.903,-11.947 87.903,-15.77 v1(89.147,-17.014)
  Bottom Layer w0.254: D1_U3_OpAmp_Sheet.2@88.698,-16.649 88.698,-16.699 88.971,-16.972 89.104,-16.972 v1@89.162,-17.03
  other v1: 89.147,-17.014 88.41,-11.439
NetD1_U4_OpAmp_Sheet_2: D1_U4_OpAmp_Sheet.2 R3_U4_OpAmp_Sheet.2 R4_U4_OpAmp_Sheet.2 | length 7
  Top Layer w0.254: v1(135.18,-11.354) 134.672,-11.861 134.672,-15.684 v1(135.917,-16.929)
  Bottom Layer w0.254: D1_U4_OpAmp_Sheet.2@135.453,-16.548 135.453,-16.598 135.726,-16.871 135.859,-16.871 v1(135.917,-16.929)
  other v1: 135.917,-16.929 135.18,-11.354
NetD1_U5_OpAmp_Sheet_2: D1_U5_OpAmp_Sheet.2 R3_U5_OpAmp_Sheet.2 R4_U5_OpAmp_Sheet.2 | length 7
  Top Layer w0.254: v1(152.841,-11.303) 152.333,-11.81 152.333,-15.633 v1(153.578,-16.878)
  Bottom Layer w0.254: D1_U5_OpAmp_Sheet.2@153.114,-16.497 153.114,-16.547 153.387,-16.82 153.52,-16.82 v1(153.578,-16.878)
  other v1: 153.578,-16.878 152.841,-11.303
NetD1_U6_OpAmp_Sheet_2: D1_U6_OpAmp_Sheet.2 R3_U6_OpAmp_Sheet.2 R4_U6_OpAmp_Sheet.2 | length 7
  Top Layer w0.254: v1(172,-11.277) 171.492,-11.785 171.492,-15.608 v1(172.737,-16.853)
  Bottom Layer w0.254: D1_U6_OpAmp_Sheet.2@172.273,-16.472 172.273,-16.522 172.546,-16.795 172.679,-16.795 v1(172.737,-16.853)
  other v1: 172.737,-16.853 172,-11.277
NetD1_U7_OpAmp_Sheet_2: D1_U7_OpAmp_Sheet.2 R3_U7_OpAmp_Sheet.2 R4_U7_OpAmp_Sheet.2 R7_U7_OpAmp_Sheet_1.1 | length 10.5
  Top Layer w0.254: v1(188.999,-11.252) 188.491,-11.759 188.491,-15.583 v1(189.736,-16.827)
  Bottom Layer w0.254: R7_U7_OpAmp_Sheet_1.1@188.999,-9.474 189.241,-9.474 189.38,-9.334 189.944,-8.771 192.294,-8.771 ; D1_U7_OpAmp_Sheet.2@189.272,-16.446 189.272,-16.496 189.545,-16.769 189.678,-16.769 v1(189.736,-16.827)
  other v1: 189.736,-16.827 188.999,-11.252
NetD1_U_OpAmp_Sheet_2: D1_U_OpAmp_Sheet.2 R3_U_OpAmp_Sheet.2 R4_U_OpAmp_Sheet.2 | length 6.3
  Top Layer w0.254: v1(-0.686,-11.62) -1.194,-12.128 -1.194,-15.951 v1(0.051,-17.196)
  other v1: 0.051,-17.196 -0.686,-11.62
NetLED1_U1_OpAmp_Sheet_2: LED1_U1_OpAmp_Sheet.2 R1_U1_OpAmp_Sheet.2
NetLED1_U2_OpAmp_Sheet_2: LED1_U2_OpAmp_Sheet.2 R1_U2_OpAmp_Sheet.2
NetLED1_U3_OpAmp_Sheet_2: LED1_U3_OpAmp_Sheet.2 R1_U3_OpAmp_Sheet.2
NetLED1_U4_OpAmp_Sheet_2: LED1_U4_OpAmp_Sheet.2 R1_U4_OpAmp_Sheet.2
NetLED1_U5_OpAmp_Sheet_2: LED1_U5_OpAmp_Sheet.2 R1_U5_OpAmp_Sheet.2
NetLED1_U6_OpAmp_Sheet_2: LED1_U6_OpAmp_Sheet.2 R1_U6_OpAmp_Sheet.2
NetLED1_U7_OpAmp_Sheet_2: LED1_U7_OpAmp_Sheet.2 LED1_U7_OpAmp_Sheet_1.2 R1_U7_OpAmp_Sheet.2 R1_U7_OpAmp_Sheet_1.2
NetLED1_U_OpAmp_Sheet_2: LED1_U_OpAmp_Sheet.2 R1_U_OpAmp_Sheet.2
NetP2_U1_OpAmp_Sheet_3: P2_U1_OpAmp_Sheet.3 SB5_U1_OpAmp_Sheet.1 SB6_U1_OpAmp_Sheet.1 | length 1.3
  Bottom Layer w0.305: SB5_U1_OpAmp_Sheet.1@16.936,-14.517 v1@16.936,-13.844 ; v1@19.984,-14.352 SB6_U1_OpAmp_Sheet.1@19.984,-13.679
  other v1: 19.922,-14.415 19.922,-14.415 16.874,-13.907 16.874,-13.907
NetP2_U2_OpAmp_Sheet_3: P2_U2_OpAmp_Sheet.3 SB5_U2_OpAmp_Sheet.1 SB6_U2_OpAmp_Sheet.1 | length 1.3
  Bottom Layer w0.305: SB5_U2_OpAmp_Sheet.1@44.879,-14.452 v1@44.879,-13.779 ; v1@47.927,-14.287 SB6_U2_OpAmp_Sheet.1@47.927,-13.614
  other v1: 47.919,-14.285 47.919,-14.285 44.871,-13.777 44.871,-13.777
NetP2_U3_OpAmp_Sheet_3: P2_U3_OpAmp_Sheet.3 SB5_U3_OpAmp_Sheet.1 SB6_U3_OpAmp_Sheet.1 | length 1.3
  Bottom Layer w0.305: SB5_U3_OpAmp_Sheet.1@91.6,-14.376 v1@91.6,-13.703 ; v1@94.648,-14.211 SB6_U3_OpAmp_Sheet.1@94.648,-13.538
  other v1: 94.634,-14.195 94.634,-14.195 91.586,-13.687 91.586,-13.687
NetP2_U4_OpAmp_Sheet_3: P2_U4_OpAmp_Sheet.3 P2_U4_OpAmp_Sheet_1.3 SB5_U4_OpAmp_Sheet.1 SB6_U4_OpAmp_Sheet.1 | length 1.3
  Bottom Layer w0.305: SB5_U4_OpAmp_Sheet.1@138.355,-14.275 v1(138.355,-13.601) ; v1(141.403,-14.109) SB6_U4_OpAmp_Sheet.1@141.403,-13.436
  other v1: 141.403,-14.109 138.355,-13.601
NetP2_U5_OpAmp_Sheet_3: P2_U5_OpAmp_Sheet.3 P2_U5_OpAmp_Sheet_1.3 SB5_U5_OpAmp_Sheet.1 SB6_U5_OpAmp_Sheet.1 | length 1.3
  Bottom Layer w0.305: SB5_U5_OpAmp_Sheet.1@156.016,-14.224 v1(156.016,-13.551) ; v1(159.064,-14.059) SB6_U5_OpAmp_Sheet.1@159.064,-13.386
  other v1: 159.064,-14.059 156.016,-13.551
NetP2_U6_OpAmp_Sheet_3: P2_U6_OpAmp_Sheet.3 P2_U6_OpAmp_Sheet_1.3 SB5_U6_OpAmp_Sheet.1 SB6_U6_OpAmp_Sheet.1 | length 1.3
  Bottom Layer w0.305: SB5_U6_OpAmp_Sheet.1@175.175,-14.198 v1(175.175,-13.525) ; v1(178.223,-14.033) SB6_U6_OpAmp_Sheet.1@178.223,-13.36
  other v1: 178.223,-14.033 175.175,-13.525
NetP2_U7_OpAmp_Sheet_3: P2_U7_OpAmp_Sheet.3 P2_U7_OpAmp_Sheet_1.3 SB5_U7_OpAmp_Sheet.1 SB5_U7_OpAmp_Sheet_1.1 SB6_U7_OpAmp_Sheet.1 SB6_U7_OpAmp_Sheet_1.1 | length 1.3
  Bottom Layer w0.305: SB5_U7_OpAmp_Sheet_1.1@192.174,-14.173 v1(192.174,-13.5) ; v1(195.222,-14.008) SB6_U7_OpAmp_Sheet_1.1@195.222,-13.335
  other v1: 195.222,-14.008 192.174,-13.5
NetP2_U_OpAmp_Sheet_3: P2_U_OpAmp_Sheet.3 SB5_U_OpAmp_Sheet.1 SB6_U_OpAmp_Sheet.1 | length 0.7
  Bottom Layer w0.305: SB5_U_OpAmp_Sheet.1@2.489,-14.541 v1(2.489,-13.868)
  other v1: 2.489,-13.868
NetR4_U1_OpAmp_Sheet_1: R4_U1_OpAmp_Sheet.1 R5_U1_OpAmp_Sheet.1 R6_U1_OpAmp_Sheet.1 U2_U1_OpAmp_Sheet.2 | length 9.3
  Bottom Layer w0.254: R4_U1_OpAmp_Sheet.1@15.131,-12.712 16.128,-11.715 U2_U1_OpAmp_Sheet.2@17.031,-11.715 ; U2_U1_OpAmp_Sheet.2@17.029,-11.713 U2_U1_OpAmp_Sheet.2@17.031,-11.715 ; U2_U1_OpAmp_Sheet.2@17.056,-11.715 U2_U1_OpAmp_Sheet.2@17.031,-11.715
  Bottom Layer w0.305: 15.234,-13.107 15.234,-17.425 16.021,-18.213 R6_U1_OpAmp_Sheet.1@17.559,-18.213
NetR4_U2_OpAmp_Sheet_1: R4_U2_OpAmp_Sheet.1 R5_U2_OpAmp_Sheet.1 R6_U2_OpAmp_Sheet.1 U2_U2_OpAmp_Sheet.2 | length 9.3
  Bottom Layer w0.254: R4_U2_OpAmp_Sheet.1@43.073,-12.647 44.071,-11.65 U2_U2_OpAmp_Sheet.2@44.974,-11.65 ; U2_U2_OpAmp_Sheet.2@44.972,-11.648 U2_U2_OpAmp_Sheet.2@44.974,-11.65 ; U2_U2_OpAmp_Sheet.2@44.998,-11.65 U2_U2_OpAmp_Sheet.2@44.974,-11.65
  Bottom Layer w0.305: 43.176,-13.043 43.176,-17.361 43.964,-18.148 R6_U2_OpAmp_Sheet.1@45.501,-18.148
NetR4_U3_OpAmp_Sheet_1: R4_U3_OpAmp_Sheet.1 R5_U3_OpAmp_Sheet.1 R6_U3_OpAmp_Sheet.1 U2_U3_OpAmp_Sheet.2 | length 9.3
  Bottom Layer w0.254: R4_U3_OpAmp_Sheet.1@89.795,-12.571 90.792,-11.574 U2_U3_OpAmp_Sheet.2@91.695,-11.574 ; U2_U3_OpAmp_Sheet.2@91.693,-11.572 U2_U3_OpAmp_Sheet.2@91.695,-11.574 ; U2_U3_OpAmp_Sheet.2@91.72,-11.574 U2_U3_OpAmp_Sheet.2@91.695,-11.574
  Bottom Layer w0.305: 89.898,-12.966 89.898,-17.284 90.685,-18.072 R6_U3_OpAmp_Sheet.1@92.222,-18.072
NetR4_U4_OpAmp_Sheet_1: R4_U4_OpAmp_Sheet.1 R5_U4_OpAmp_Sheet.1 R6_U4_OpAmp_Sheet.1 U2_U4_OpAmp_Sheet.2 | length 9.3
  Bottom Layer w0.254: R4_U4_OpAmp_Sheet.1@136.55,-12.47 137.547,-11.472 U2_U4_OpAmp_Sheet.2@138.45,-11.472 ; U2_U4_OpAmp_Sheet.2@138.448,-11.47 U2_U4_OpAmp_Sheet.2@138.45,-11.472 ; U2_U4_OpAmp_Sheet.2@138.475,-11.472 U2_U4_OpAmp_Sheet.2@138.45,-11.472
  Bottom Layer w0.305: 136.653,-12.865 136.653,-17.183 137.44,-17.97 R6_U4_OpAmp_Sheet.1@138.978,-17.97
NetR4_U5_OpAmp_Sheet_1: R4_U5_OpAmp_Sheet.1 R5_U5_OpAmp_Sheet.1 R6_U5_OpAmp_Sheet.1 U2_U5_OpAmp_Sheet.2 | length 9.3
  Bottom Layer w0.254: R4_U5_OpAmp_Sheet.1@154.211,-12.419 155.208,-11.422 U2_U5_OpAmp_Sheet.2@156.111,-11.422 ; U2_U5_OpAmp_Sheet.2@156.109,-11.419 U2_U5_OpAmp_Sheet.2@156.111,-11.422 ; U2_U5_OpAmp_Sheet.2@156.136,-11.421 U2_U5_OpAmp_Sheet.2@156.111,-11.422
  Bottom Layer w0.305: 154.314,-12.814 154.314,-17.132 155.101,-17.919 R6_U5_OpAmp_Sheet.1@156.639,-17.919
NetR4_U6_OpAmp_Sheet_1: R4_U6_OpAmp_Sheet.1 R5_U6_OpAmp_Sheet.1 R6_U6_OpAmp_Sheet.1 U2_U6_OpAmp_Sheet.2 | length 9.3
  Bottom Layer w0.254: R4_U6_OpAmp_Sheet.1@173.37,-12.393 174.367,-11.396 U2_U6_OpAmp_Sheet.2@175.27,-11.396 ; U2_U6_OpAmp_Sheet.2@175.268,-11.394 U2_U6_OpAmp_Sheet.2@175.27,-11.396 ; U2_U6_OpAmp_Sheet.2@175.295,-11.396 U2_U6_OpAmp_Sheet.2@175.27,-11.396
  Bottom Layer w0.305: 173.473,-12.789 173.473,-17.107 174.26,-17.894 R6_U6_OpAmp_Sheet.1@175.797,-17.894
NetR4_U7_OpAmp_Sheet_1: R4_U7_OpAmp_Sheet.1 R4_U7_OpAmp_Sheet_1.1 R5_U7_OpAmp_Sheet.1 R6_U7_OpAmp_Sheet.1 U2_U7_OpAmp_Sheet.2 | length 9.3
  Bottom Layer w0.254: R4_U7_OpAmp_Sheet_1.1@190.369,-12.368 191.366,-11.371 U2_U7_OpAmp_Sheet.2@192.269,-11.371 ; U2_U7_OpAmp_Sheet.2@192.267,-11.369 U2_U7_OpAmp_Sheet.2@192.269,-11.371 ; U2_U7_OpAmp_Sheet.2@192.294,-11.371 U2_U7_OpAmp_Sheet.2@192.269,-11.371
  Bottom Layer w0.305: 190.472,-12.763 190.472,-17.081 191.259,-17.869 R6_U7_OpAmp_Sheet.1@192.797,-17.869
NetR4_U_OpAmp_Sheet_1: R4_U_OpAmp_Sheet.1 R5_U_OpAmp_Sheet.1 R6_U_OpAmp_Sheet.1 U2_U_OpAmp_Sheet.2 | length 9.3
  Bottom Layer w0.254: R4_U_OpAmp_Sheet.1@0.684,-12.737 1.681,-11.739 U2_U_OpAmp_Sheet.2@2.584,-11.739
  Bottom Layer w0.305: 0.787,-13.132 0.787,-17.45 1.574,-18.237 R6_U_OpAmp_Sheet.1@3.111,-18.237
NetR10_U1_OpAmp_Sheet_3: R10_U1_OpAmp_Sheet.3 R11_U1_OpAmp_Sheet.1 U2_U1_OpAmp_Sheet.13 | length 10.8
  Bottom Layer w0.254: U2_U1_OpAmp_Sheet.13@22.631,-11.715 23.469,-11.715 24.403,-12.65 ; R11_U1_OpAmp_Sheet.1@23.642,-7.215 23.642,-8.173 24.403,-8.935 24.403,-12.65 ; R10_U1_OpAmp_Sheet.3@23.972,-15.317 23.972,-14.301 24.403,-13.869 24.403,-12.65
NetR10_U2_OpAmp_Sheet_3: R10_U2_OpAmp_Sheet.3 R11_U2_OpAmp_Sheet.1 U2_U2_OpAmp_Sheet.13 | length 10.8
  Bottom Layer w0.254: U2_U2_OpAmp_Sheet.13@50.574,-11.65 51.411,-11.65 52.346,-12.585 ; R11_U2_OpAmp_Sheet.1@51.584,-7.15 51.584,-8.108 52.346,-8.87 52.346,-12.585 ; R10_U2_OpAmp_Sheet.3@51.915,-15.253 51.915,-14.236 52.346,-13.805 52.346,-12.585
NetR10_U3_OpAmp_Sheet_3: R10_U3_OpAmp_Sheet.3 R11_U3_OpAmp_Sheet.1 U2_U3_OpAmp_Sheet.13 | length 10.8
  Bottom Layer w0.254: U2_U3_OpAmp_Sheet.13@97.295,-11.574 98.133,-11.574 99.067,-12.509 ; R11_U3_OpAmp_Sheet.1@98.306,-7.074 98.306,-8.032 99.067,-8.794 99.067,-12.509 ; R10_U3_OpAmp_Sheet.3@98.636,-15.177 98.636,-14.16 99.067,-13.728 99.067,-12.509
NetR10_U4_OpAmp_Sheet_3: R10_U4_OpAmp_Sheet.3 R11_U4_OpAmp_Sheet.1 U2_U4_OpAmp_Sheet.13 | length 10.8
  Bottom Layer w0.254: U2_U4_OpAmp_Sheet.13@144.05,-11.472 144.888,-11.472 145.822,-12.407 ; R11_U4_OpAmp_Sheet.1@145.061,-6.972 145.061,-7.931 145.822,-8.692 145.822,-12.407 ; R10_U4_OpAmp_Sheet.3@145.391,-15.075 145.391,-14.058 145.822,-13.627 145.822,-12.407
NetR10_U5_OpAmp_Sheet_3: R10_U5_OpAmp_Sheet.3 R11_U5_OpAmp_Sheet.1 U2_U5_OpAmp_Sheet.13 | length 10.8
  Bottom Layer w0.254: U2_U5_OpAmp_Sheet.13@161.711,-11.422 162.549,-11.422 163.483,-12.356 ; R11_U5_OpAmp_Sheet.1@162.722,-6.921 162.722,-7.88 163.483,-8.641 163.483,-12.356 ; R10_U5_OpAmp_Sheet.3@163.052,-15.024 163.052,-14.007 163.483,-13.576 163.483,-12.356
NetR10_U6_OpAmp_Sheet_3: R10_U6_OpAmp_Sheet.3 R11_U6_OpAmp_Sheet.1 U2_U6_OpAmp_Sheet.13 | length 10.8
  Bottom Layer w0.254: U2_U6_OpAmp_Sheet.13@180.87,-11.396 181.708,-11.396 182.642,-12.331 ; R11_U6_OpAmp_Sheet.1@181.881,-6.896 181.881,-7.854 182.642,-8.616 182.642,-12.331 ; R10_U6_OpAmp_Sheet.3@182.211,-14.999 182.211,-13.982 182.642,-13.551 182.642,-12.331
NetR10_U7_OpAmp_Sheet_3: R10_U7_OpAmp_Sheet.3 R11_U7_OpAmp_Sheet.1 R11_U7_OpAmp_Sheet_1.1 U2_U7_OpAmp_Sheet.13 | length 10.8
  Bottom Layer w0.254: U2_U7_OpAmp_Sheet.13@197.869,-11.371 198.707,-11.371 199.641,-12.306 ; R11_U7_OpAmp_Sheet_1.1@198.88,-6.87 198.88,-7.829 199.641,-8.591 199.641,-12.306 ; R10_U7_OpAmp_Sheet.3@199.21,-14.973 199.21,-13.957 199.641,-13.525 199.641,-12.306
NetR10_U_OpAmp_Sheet_3: R10_U_OpAmp_Sheet.3 R11_U_OpAmp_Sheet.1 U2_U_OpAmp_Sheet.13 | length 10.8
  Bottom Layer w0.254: U2_U_OpAmp_Sheet.13@8.184,-11.739 9.022,-11.739 9.956,-12.674 ; R11_U_OpAmp_Sheet.1@9.195,-7.239 9.195,-8.198 9.956,-8.959 9.956,-12.674 ; R10_U_OpAmp_Sheet.3@9.525,-15.342 9.525,-14.325 9.956,-13.894 9.956,-12.674
OUT1_U1_OpAmp_Sheet: D1_U1_OpAmp_Sheet.1 D2_U1_OpAmp_Sheet.2 SB7_U1_OpAmp_Sheet.1 U2_U1_OpAmp_Sheet.1 | length 12.5
  Top Layer w0.305: v1@17.178,-16.586 17.184,-16.586 v1@24.067,-16.586
  Bottom Layer w0.254: D1_U1_OpAmp_Sheet.1@16.098,-16.555 D1_U1_OpAmp_Sheet.1@16.334,-16.79
  Bottom Layer w0.305: D1_U1_OpAmp_Sheet.1@16.098,-16.555 16.098,-12.514 16.247,-12.365 U2_U1_OpAmp_Sheet.1@17.056,-12.365 ; 17.241,-16.282 17.241,-16.46 v1@17.317,-16.46
  other v1: 17.179,-16.599 17.179,-16.599 24.062,-16.599 24.062,-16.599
OUT1_U2_OpAmp_Sheet: D1_U2_OpAmp_Sheet.1 D2_U2_OpAmp_Sheet.2 SB7_U2_OpAmp_Sheet.1 U2_U2_OpAmp_Sheet.1 | length 12.5
  Top Layer w0.305: v1@45.169,-16.469 v1(45.175,-16.469) v1(52.059,-16.469)
  Bottom Layer w0.254: D1_U2_OpAmp_Sheet.1@44.041,-16.49 D1_U2_OpAmp_Sheet.1@44.277,-16.726
  Bottom Layer w0.305: D1_U2_OpAmp_Sheet.1@44.041,-16.49 44.041,-12.449 44.189,-12.3 U2_U2_OpAmp_Sheet.1@44.998,-12.3 ; v1@45.184,-16.218 45.184,-16.395 v1@45.26,-16.395
  other v1: 45.175,-16.469 52.059,-16.469
OUT1_U3_OpAmp_Sheet: D1_U3_OpAmp_Sheet.1 D2_U3_OpAmp_Sheet.2 SB7_U3_OpAmp_Sheet.1 U2_U3_OpAmp_Sheet.1 | length 24.7
  Top Layer w0.305: v1@91.884,-16.379 v1(91.891,-16.379) v1(98.774,-16.379)
  Bottom Layer w0.254: D1_U3_OpAmp_Sheet.1@90.762,-16.414 D1_U3_OpAmp_Sheet.1@90.998,-16.65
  Bottom Layer w0.305: D1_U3_OpAmp_Sheet.1@90.762,-16.414 90.762,-12.373 90.911,-12.224 U2_U3_OpAmp_Sheet.1@91.72,-12.224 ; v1@91.905,-16.141 91.905,-16.319 v1@91.981,-16.319 ; SB7_U3_OpAmp_Sheet.1@98.865,-1.168 ccw(c99.152,-0.881) 99.152,-1.287 v1@99.627,-1.287
  Bottom Layer w0.381: v1@98.509,-6.286 99.779,-7.556 99.779,-16.04 99.423,-16.395 v1@98.788,-16.395
  other v1: 91.891,-16.379 98.774,-16.379 98.495,-6.27 98.495,-6.27 99.612,-1.271 99.612,-1.271
OUT1_U4_OpAmp_Sheet: D1_U4_OpAmp_Sheet.1 D2_U4_OpAmp_Sheet.2 SB7_U4_OpAmp_Sheet.1 U2_U4_OpAmp_Sheet.1 | length 12.5
  Top Layer w0.305: v1@138.654,-16.294 v1(138.66,-16.294) v1(145.543,-16.294)
  Bottom Layer w0.254: D1_U4_OpAmp_Sheet.1@137.517,-16.312 D1_U4_OpAmp_Sheet.1@137.753,-16.548
  Bottom Layer w0.305: D1_U4_OpAmp_Sheet.1@137.517,-16.312 137.517,-12.271 137.666,-12.122 U2_U4_OpAmp_Sheet.1@138.475,-12.122 ; v1@138.66,-16.04 138.66,-16.218 v1@138.736,-16.218
  other v1: 138.66,-16.294 145.543,-16.294
OUT1_U5_OpAmp_Sheet: D1_U5_OpAmp_Sheet.1 D2_U5_OpAmp_Sheet.2 SB7_U5_OpAmp_Sheet.1 U2_U5_OpAmp_Sheet.1 | length 12.5
  Top Layer w0.305: v1@156.315,-16.243 v1(156.321,-16.243) v1(163.205,-16.243)
  Bottom Layer w0.254: D1_U5_OpAmp_Sheet.1@155.178,-16.261 D1_U5_OpAmp_Sheet.1@155.414,-16.497
  Bottom Layer w0.305: D1_U5_OpAmp_Sheet.1@155.178,-16.261 155.178,-12.22 155.327,-12.072 U2_U5_OpAmp_Sheet.1@156.136,-12.071 ; v1@156.321,-15.989 156.321,-16.167 v1@156.397,-16.167
  other v1: 156.321,-16.243 163.205,-16.243
OUT1_U6_OpAmp_Sheet: D1_U6_OpAmp_Sheet.1 D2_U6_OpAmp_Sheet.2 SB7_U6_OpAmp_Sheet.1 U2_U6_OpAmp_Sheet.1 | length 18.8
  Top Layer w0.305: v1@175.474,-16.218 v1(175.48,-16.218) v1(182.363,-16.218) ; v1(182.084,-6.108) 182.44,-5.753 182.44,-4.788 182.825,-4.402 182.825,-2.243 183.202,-1.867 v1(183.202,-1.109)
  Bottom Layer w0.254: D1_U6_OpAmp_Sheet.1@174.337,-16.236 D1_U6_OpAmp_Sheet.1@174.573,-16.472
  Bottom Layer w0.305: D1_U6_OpAmp_Sheet.1@174.337,-16.236 174.337,-12.195 174.486,-12.046 U2_U6_OpAmp_Sheet.1@175.295,-12.046 ; v1@175.48,-15.964 175.48,-16.141 v1@175.556,-16.141 ; SB7_U6_OpAmp_Sheet.1@182.44,-0.99 ccw(c182.727,-0.703) 182.727,-1.109 v1(183.202,-1.109)
  other v1: 175.48,-16.218 182.363,-16.218 182.084,-6.108 183.202,-1.109
OUT1_U7_OpAmp_Sheet: D1_U7_OpAmp_Sheet.1 D2_U7_OpAmp_Sheet.2 SB7_U7_OpAmp_Sheet.1 SB7_U7_OpAmp_Sheet_1.1 U2_U7_OpAmp_Sheet.1 | length 18.8
  Top Layer w0.305: v1@192.473,-16.192 v1(192.479,-16.192) v1(199.362,-16.192) ; v1(199.083,-6.083) 199.439,-5.727 199.439,-4.762 199.824,-4.376 199.824,-2.217 200.201,-1.841 v1(200.201,-1.084)
  Bottom Layer w0.254: D1_U7_OpAmp_Sheet.1@191.336,-16.211 D1_U7_OpAmp_Sheet.1@191.572,-16.446
  Bottom Layer w0.305: D1_U7_OpAmp_Sheet.1@191.336,-16.211 191.336,-12.17 191.485,-12.021 U2_U7_OpAmp_Sheet.1@192.294,-12.021 ; v1@192.479,-15.938 192.479,-16.116 v1@192.555,-16.116 ; SB7_U7_OpAmp_Sheet_1.1@199.439,-0.965 ccw(c199.726,-0.677) 199.726,-1.084 v1(200.201,-1.084)
  other v1: 192.479,-16.192 199.362,-16.192 199.083,-6.083 200.201,-1.084
OUT1_U_OpAmp_Sheet: D1_U_OpAmp_Sheet.1 D2_U_OpAmp_Sheet.2 SB7_U_OpAmp_Sheet.1 U2_U_OpAmp_Sheet.1 | length 29.6
  Top Layer w0.305: v1(2.794,-16.561) v1(9.677,-16.561) ; v1(9.398,-6.452) 9.754,-6.096 9.754,-5.131 10.139,-4.745 10.139,-2.586 10.516,-2.21 v1(10.516,-1.453)
  Bottom Layer w0.305: D1_U_OpAmp_Sheet.1@1.651,-16.579 1.651,-12.538 1.799,-12.389 U2_U_OpAmp_Sheet.1@2.609,-12.389 ; SB7_U_OpAmp_Sheet.1@9.754,-1.333 ccw(c10.041,-1.046) 10.041,-1.453 v1(10.516,-1.453)
  Bottom Layer w0.381: v1(9.398,-6.452) 10.668,-7.722 10.668,-16.205 10.312,-16.561 v1(9.677,-16.561)
  other v1: 2.794,-16.561 9.677,-16.561 9.398,-6.452 10.516,-1.453
RECT_U1_OpAmp_Sheet: R7_U1_OpAmp_Sheet.2 R9_U1_OpAmp_Sheet.2 U2_U1_OpAmp_Sheet.7 | length 1.4
  Bottom Layer w0.254: U2_U1_OpAmp_Sheet.7@17.056,-8.465 17.133,-8.465 17.291,-8.307 R9_U1_OpAmp_Sheet.2@17.291,-7.24
RECT_U2_OpAmp_Sheet: R7_U2_OpAmp_Sheet.2 R9_U2_OpAmp_Sheet.2 U2_U2_OpAmp_Sheet.7 | length 1.4
  Bottom Layer w0.254: U2_U2_OpAmp_Sheet.7@44.998,-8.4 45.076,-8.4 45.234,-8.242 R9_U2_OpAmp_Sheet.2@45.234,-7.175
RECT_U3_OpAmp_Sheet: R7_U3_OpAmp_Sheet.2 R9_U3_OpAmp_Sheet.2 U2_U3_OpAmp_Sheet.7 | length 1.4
  Bottom Layer w0.254: U2_U3_OpAmp_Sheet.7@91.72,-8.324 91.797,-8.324 91.955,-8.166 R9_U3_OpAmp_Sheet.2@91.955,-7.099
RECT_U4_OpAmp_Sheet: R7_U4_OpAmp_Sheet.2 R9_U4_OpAmp_Sheet.2 U2_U4_OpAmp_Sheet.7 | length 1.4
  Bottom Layer w0.254: U2_U4_OpAmp_Sheet.7@138.475,-8.222 138.552,-8.222 138.71,-8.064 R9_U4_OpAmp_Sheet.2@138.71,-6.997